# Allegro board minicar-v2_updated.brd
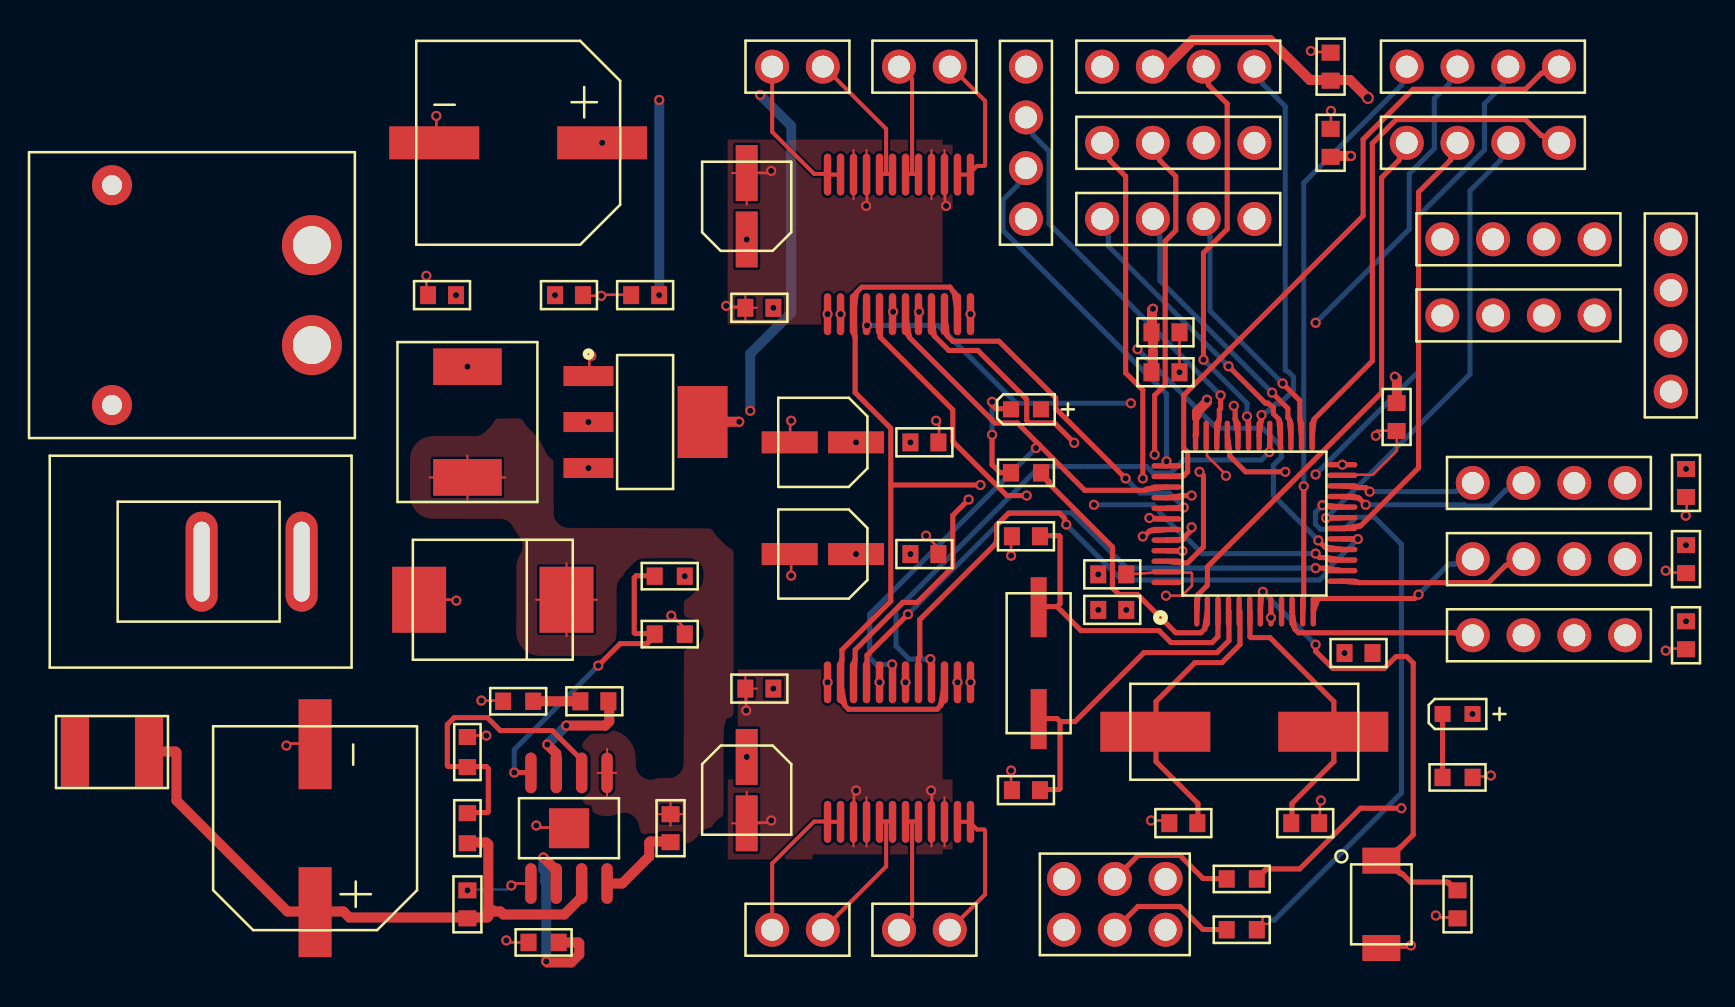
[diagram p0: board, top side]
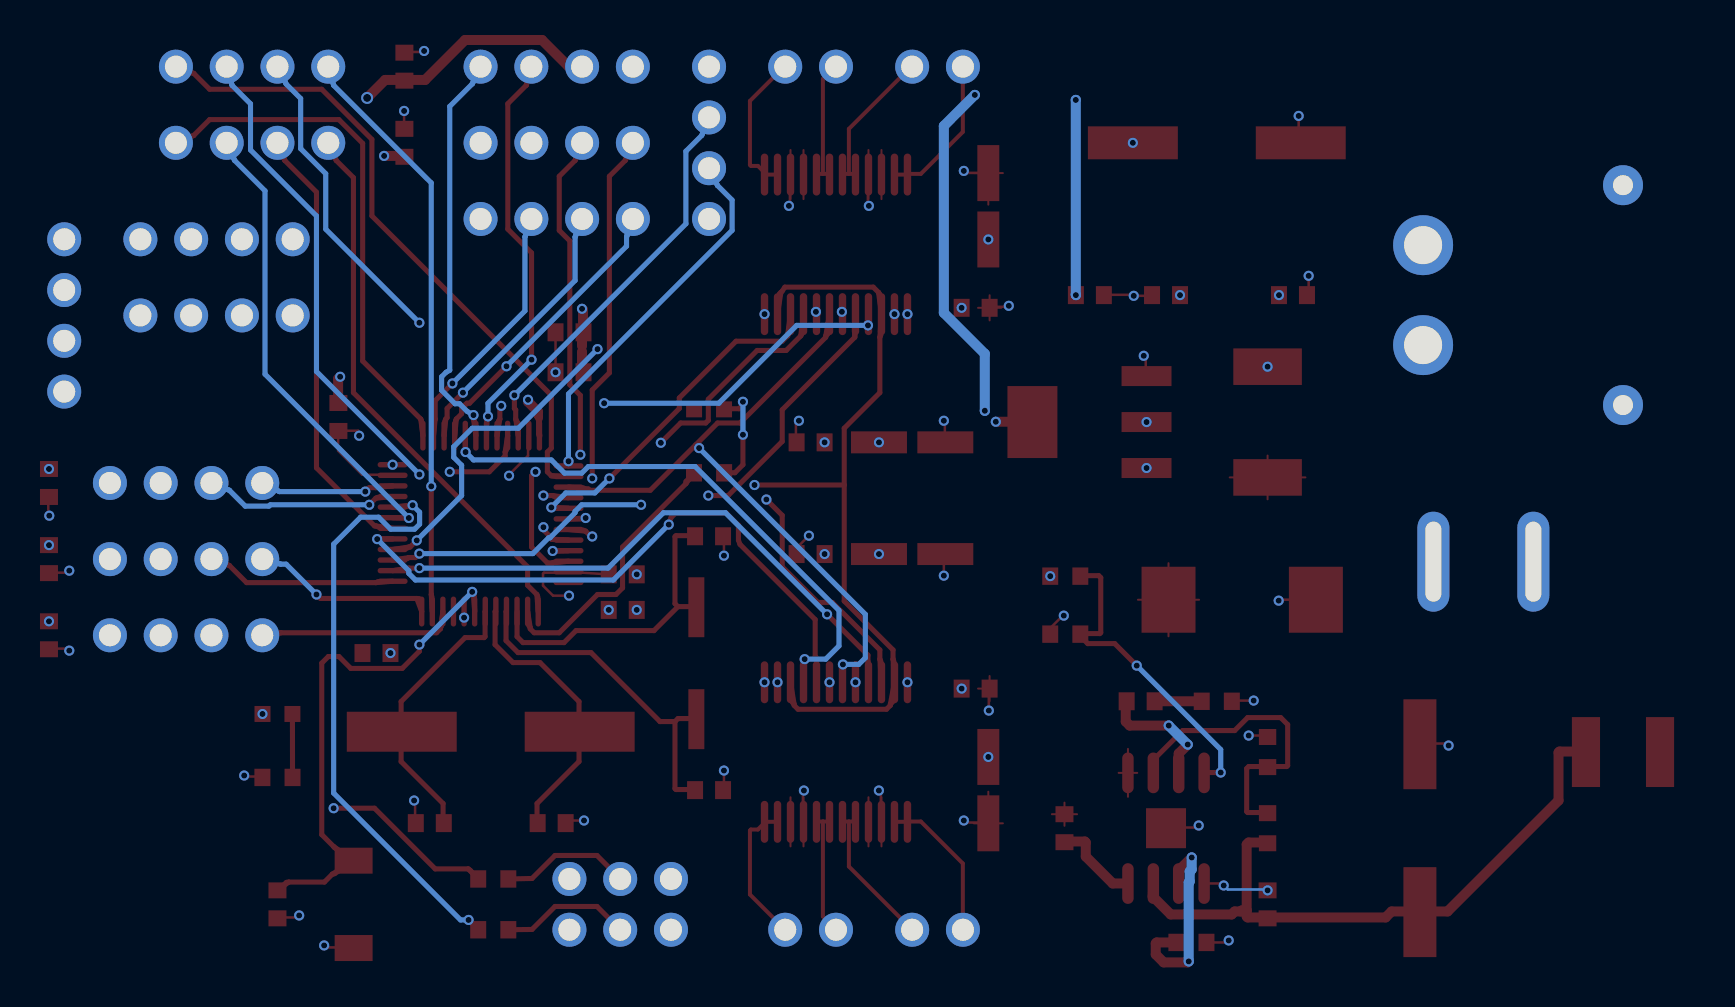
[diagram p1: board, bottom side, seen from below]

No outline. copper layers: TOP, GND, POWER, BOTTOM. Coordinates in mm from the lowest, leftmost part position.

## Design rules (mm)
constraint set DEFAULT: min track width 0.1
net group DP1_8MHZ: nets OSC_IN OSC_OUT
net group DP1_32KHZ: nets PC14 PC15

## Placement (name value [footprint] x y rotation side)
C1  22pF,16V  [C0603]  45.72 20.32 0 top
C2  22pF,16V  [C0603]  45.72 7.62 0 top
C3  22pF,16V  [C0603]  53.59 5.97 0 top
C4  22pF,16V  [C0603]  59.69 5.97 180 top
C5  4.7uF,16V  [C0603]  52.7 30.53 180 top
C6  100nF,16V  [C0603]  50.04 16.64 180 top
C7  100nF,16V  [C0603]  67.31 1.91 90 top
C8  100nF,16V  [C0603]  52.7 28.53 180 top
C9  10nF,16V  [C0603]  50.04 18.42 180 top
C10  1uF,16V  [C0603]  62.36 14.48 0 top
C11  100nF,16V  [C0603]  64.26 26.29 90 top
C12  100uF,50V  [C0603]  27.94 5.71 270 top
C13  220uF, 50V  [CP_D10XL10R2]  10.16 5.71 90 top
C14  10uF,50V  [C0603]  17.78 1.91 270 top
C15  22uF,50V  [C0603]  16.51 32.39 180 top
C16  220uF, 50V  [CP_D10XL10R2]  20.32 40.01 180 top
C17  150pF,50V  [C0603]  24.13 12.07 180 top
C18  4.7uF,50V  [C0603]  26.67 32.39 180 top
C19  1uF,50V  [C0603]  22.86 32.39 180 top
C20  100nF,16V  [C0603]  32.39 31.75 0 top
C21  100nF,16V  [C0603]  40.64 25.02 180 top
C22  10uF, 16V  [CP_D4XL54]  31.75 36.83 90 top
C23  10uF, 16V  [CP_D4XL54]  35.56 25.02 180 top
C24  100nF,16V  [C0603]  32.39 12.7 0 top
C25  100nF,16V  [C0603]  40.64 19.43 180 top
C26  10uF, 16V  [CP_D4XL54]  31.75 7.62 270 top
C27  10uF, 16V  [CP_D4XL54]  35.56 19.43 180 top
C28  100nF,16V  [C0603]  60.96 43.81 270 top
C29  100nF,16V  [C0603]  78.74 15.37 90 top
C30  100nF,16V  [C0603]  78.74 19.18 90 top
C31  100nF,16V  [C0603]  60.96 40.01 270 top
C32  100nF,16V  [C0603]  78.74 22.99 90 top
D1  LED  [LED0603]  67.31 11.43 0 top
D2  LED  [LED0603]  45.72 26.67 0 top
D3  SS34  [DO214AB]  19.05 17.15 180 top
F1  SMD1812-150-33 (3A)  [SMD1812]  0 9.53 0 top
J1  HEADER 4  [HDR4_P254]  45.72 40.01 90 top
J2  HEADER 3X2  [HDR3X2_P254]  50.16 1.91 0 top
J3  HEADER 4  [HDR4_P254]  68.58 43.81 0 top
J4  HEADER 4  [HDR4_P254]  68.58 40.01 0 top
J5  HDR_3V3  [HDR4_P254]  70.36 35.18 0 top
J6  HDR_5V  [HDR4_P254]  70.36 31.37 0 top
J7  HDR_GND  [HDR4_P254]  77.98 31.37 270 top
J8  HEADER 2  [HDR2_P254]  40.64 43.81 180 top
J9  HEADER 2  [HDR2_P254]  34.29 43.81 180 top
J10  HEADER 2  [HDR2_P254]  34.29 0.64 0 top
J11  HEADER 2  [HDR2_P254]  40.64 0.64 0 top
J12  HDR_USART1  [HDR4_P254]  53.34 43.81 180 top
J13  HDR_USART2  [HDR4_P254]  71.88 19.18 0 top
J14  HDR_SERVO  [HDR4_P254]  71.88 15.37 0 top
J15  HDR_I2C1  [HDR4_P254]  53.34 40.01 180 top
J16  HDR_I2C2  [HDR4_P254]  71.88 22.99 180 top
J17  HDR_SPI2  [HDR4_P254]  53.34 36.2 0 top
L1  10uH,3A  [H0630]  17.78 26.04 90 top
R1  10K  [R0603]  56.52 0.64 180 top
R2  10K  [R0603]  56.52 3.18 0 top
R3  510R  [R0603]  67.31 8.26 0 top
R4  510R  [R0603]  45.72 23.5 0 top
R5  100K  [R0603]  17.78 5.71 270 top
R6  100K  [R0603]  17.78 9.53 270 top
R7  100K  [R0603]  21.59 0 0 top
R8  210K 1%  [R0603]  27.9 18.33 180 top
R9  100K  [R0603]  20.32 12.07 0 top
R10  40R2K 1%  [R0603]  27.9 15.43 0 top
SW1  SW_PB_SPST  [SW_PB_4X3]  63.5 1.91 90 top
SW2  -  [KCD11-2P]  6.99 19.05 180 top
U1  STM32F103C8T6  [LQFP_48]  57.15 20.96 0 top
U2  -  [XT30]  0 32.39 90 top
U3  MP1584EN  [SOIC-8-EP]  22.86 5.71 180 top
U4  LDL1117_33R  [SOT223]  26.67 26.04 180 top
U5  TB6612FNG  [SSOP24]  39.37 34.92 180 top
U6  TB6612FNG  [SSOP24]  39.37 9.53 0 top
Y1  32.768kHz  [SMD_32KHZ]  46.36 13.97 90 top
Y2  8MHz  [SMD_8MHZ]  56.64 10.54 180 top

## Library data of the parts
C1-C12 C14 C15 C17-C21 C24 C25 C28-C32 = CAP NP
C13 C16 C22 C23 C26 C27 = CAP POL
D1 D2 = LED
D3 = DIODE
F1 = FUSE
J1 J3-J7 J12-J17 = HEADER 4
J2 = HEADER 3X2
J8-J11 = HEADER 2
L1 = INDUCTOR
R1-R10 = R2
SW1 = SW_PB_SPST
SW2 = SW SPST
U1 = STM32F103C8T6
U2 = XT30
U3 = MP1584EN
U4 = LDL1117_33R
U5 U6 = TB6612FNG
Y1 Y2 = CRYSTAL

## Footprints (pads in the part's own frame, mm; a bottom-side part is the same pattern mirrored in y, then rotated)
C0603
  rect 0.8x0.9 smd: 1(-0.7,0) 2(0.7,0)
CP_D4XL54
  rect 2.8x1.1 smd: 1(-1.66,0) 2(1.66,0)
CP_D10XL10R2
  rect 4.5x1.65 smd: 1(-4.2,0) 2(4.2,0)
DO214AB
  rect 2.7x3.3 smd: 1(-3.686,0) 2(3.686,0)
H0630
  rect 1.83x3.43 smd: 1(-2.77,0) 2(2.77,0)
HDR2_P254
  round 1.7 hole 1.1: 1(-1.27,0) 2(1.27,0)
HDR3X2_P254
  round 1.7 hole 1.1: 1(-2.54,1.27) 2(-2.54,-1.27) 3(0,1.27) 4(0,-1.27) 5(2.54,1.27) 6(2.54,-1.27)
HDR4_P254
  round 1.7 hole 1.1: 1(-3.81,0) 2(-1.27,0) 3(1.27,0) 4(3.81,0)
KCD11-2P
  oval 1.6x5 hole 0.8x4 unplated: (-2.5,0) (2.5,0)
LED0603
  rect 0.8x0.8 smd: 1(-0.749,0) 2(0.749,0)
LQFP_48
  oval 0.27x1.5 smd: 1(-2.885,-4.4) 2(-2.355,-4.4) 3(-1.825,-4.4) 4(-1.295,-4.4) 5(-0.765,-4.4) 6(-0.235,-4.4) 7(0.295,-4.4) 8(0.825,-4.4) 9(1.355,-4.4) 10(1.885,-4.4) 11(2.415,-4.4) 12(2.945,-4.4) 25(2.885,4.4) 26(2.355,4.4) 27(1.825,4.4) 28(1.295,4.4) 29(0.765,4.4) 30(0.235,4.4) 31(-0.295,4.4) 32(-0.825,4.4) 33(-1.355,4.4) 34(-1.885,4.4) 35(-2.415,4.4) 36(-2.945,4.4)
  oval 1.5x0.27 smd: 13(4.4,-2.885) 14(4.4,-2.355) 15(4.4,-1.825) 16(4.4,-1.295) 17(4.4,-0.765) 18(4.4,-0.235) 19(4.4,0.295) 20(4.4,0.825) 21(4.4,1.355) 22(4.4,1.885) 23(4.4,2.415) 24(4.4,2.945) 37(-4.4,2.885) 38(-4.4,2.355) 39(-4.4,1.825) 40(-4.4,1.295) 41(-4.4,0.765) 42(-4.4,0.235) 43(-4.4,-0.295) 44(-4.4,-0.825) 45(-4.4,-1.355) 46(-4.4,-1.885) 47(-4.4,-2.415) 48(-4.4,-2.945)
R0603
  rect 0.8x0.87 smd: 1(-0.753,0) 2(0.753,0)
SMD1812
  rect 1.407x3.499 smd: 1(-1.853,0) 2(1.853,0)
SMD_8MHZ
  rect 5.5x2 smd: 1(-4.45,0) 2(4.45,0)
SMD_32KHZ
  rect 3x0.8 smd: 1(-2.8,0) 2(2.8,0)
SOIC-8-EP
  oval 0.574x2.038 smd: 1(-1.905,-2.769) 2(-0.635,-2.769) 3(0.635,-2.769) 4(1.905,-2.769) 5(1.905,2.769) 6(0.635,2.769) 7(-0.635,2.769) 8(-1.905,2.769)
  rect 2x2 smd: 9(0,0)
SOT223
  rect 2.5x1 smd: 1(2.835,-2.3) 2(2.835,0) 3(2.835,2.3)
  rect 2.5x3.6 smd: 4(-2.873,0)
SSOP24
  oval 0.37x2.1 smd: 1(-3.575,-3.491) 2(-2.925,-3.491) 3(-2.275,-3.491) 4(-1.625,-3.491) 5(-0.975,-3.491) 6(-0.325,-3.491) 7(0.325,-3.491) 8(0.975,-3.491) 9(1.625,-3.491) 10(2.275,-3.491) 11(2.925,-3.491) 12(3.575,-3.491) 13(3.575,3.491) 14(2.925,3.491) 15(2.275,3.491) 16(1.625,3.491) 17(0.975,3.491) 18(0.325,3.491) 19(-0.325,3.491) 20(-0.975,3.491) 21(-1.625,3.491) 22(-2.275,3.491) 23(-2.925,3.491) 24(-3.575,3.491)
SW_PB_4X3
  rect 1.3x1.9 smd: 1(-2.185,0) 2(2.185,0)
XT30
  round 3 hole 1.9: 1(2.5,-10) 2(-2.5,-10)
  round 2 hole 1: 3(5.5,0) 4(-5.5,0)

## Nets
GND: C1.1 C2.1 C3.1 C4.1 C5.1 C6.1 C7.1 C8.1 C9.1 C10.1 C11.1 C13.2 C14.1 C15.2 C16.2 C18.2 C19.1 C20.1 C21.1 C22.2 C23.2 C24.1 C25.1 C26.2 C27.2 C28.1 C29.1 C30.1 C31.1 C32.1 D3.2 J1.1 J2.5 J2.6 J7.1 J7.2 J7.3 J7.4 J12.4 J13.4 J14.3 J14.4 J15.1 J16.1 J17.4 R3.2 R6.1 R7.1 R9.1 R10.2 SW1.1 U1.8 U1.23 U1.35 U1.47(VSS_3) U2.1 U2.3 U2.4 U3.5 U3.9 U4.1 U5.3 U5.4 U5.9 U5.10 U5.18 U6.3 U6.4 U6.9 U6.10 U6.18
VBAT: J4.1 U1.1
VCC3V3: C5.2 C6.2 C8.2 C9.2 C10.2 C11.2 C18.1 C30.2 C31.2 C32.2 D1.2 D2.2 J1.4 J2.1 J2.2 J5.1 J5.2 J5.3 J5.4 J13.3 J15.2 J16.2 U1.9 U1.24 U1.36 U1.48 U4.2 U4.4(VOUT2)
VCC5V: C15.1 C16.1 C19.2 C20.2 C21.2 C22.1 C23.1 C24.2 C25.2 C26.1 C27.1 C28.2 C29.2 J6.1 J6.2 J6.3 J6.4 J12.3 J14.2 L1.2 R8.1 U4.3 U5.13 U5.14(VM3) U5.20 U5.24 U6.13 U6.14(VM3) U6.20 U6.24
VIN_BAT: C13.1 C14.2 F1.2 R5.2 U3.7(VIN)
BOOT0: R2.2 U1.44
BOOT1: R1.1 U1.20
I2C1_SCL: J15.3 U1.42
I2C1_SDA: J15.4 U1.43
I2C2_SCL: J16.3 U1.21
I2C2_SDA: J16.4 U1.22
MOTORIC1_AIN1: U1.40 U5.21
MOTORIC1_AIN2: U1.41 U5.22
MOTORIC1_BIN1: U1.45 U5.17
MOTORIC1_BIN2: U1.46 U5.16
MOTORIC2_AIN1: U1.14 U6.21
MOTORIC2_AIN2: U1.15 U6.22
MOTORIC2_BIN1: U1.17 U6.17
MOTORIC2_BIN2: U1.29 U6.16
MOTORIC_STBY: U1.39 U5.19 U6.19
OSC_IN: C3.2 U1.5 Y2.2
OSC_OUT: C4.2 U1.6 Y2.1
PA1: J3.1 U1.11
PA11: J3.2 U1.32
PA12: J3.3 U1.33
PA15: J3.4 U1.38
PB0: J4.2 U1.18
PB1: J4.3 U1.19
PB12: J4.4 U1.25
PC13: R4.2 U1.2
PC14: C1.2 U1.3 Y1.2
PC15: C2.2 U1.4 Y1.1
RESET: C7.2 SW1.2 U1.7
SPI2_MISO: J17.2 U1.27
SPI2_MOSI: J17.1 U1.28
SPI2_SCK: J17.3 U1.26
SWCLK: J1.2 U1.37
SWDIO: J1.3 U1.34
TIM2_PWM: J14.1 U1.10
TIM3_PWM: U1.16 U5.15 U5.23 U6.15 U6.23
USART1_RX: J12.2 U1.31
USART1_TX: J12.1 U1.30
USART2_RX: J13.2 U1.13
USART2_TX: J13.1 U1.12
N13546: J8.1 U5.1 U5.2
N13563: J8.2 U5.5 U5.6
N13598: J9.1 U5.7 U5.8
N13619: J9.2 U5.11 U5.12
N15223: J10.1 U6.1 U6.2
N15263: J10.2 U6.5 U6.6
N15407: J11.1 U6.7 U6.8
N15519: J11.2 U6.11 U6.12
N31972: C12.2 U3.8
N31979: C12.1 D3.1(K) L1.1 U3.1
N32592: R7.2 U3.6
N32821: R5.1 R6.2 U3.2
N35796: C17.1 U3.3
N36210: C17.2 R9.2
N38494: R8.2 R10.1 U3.4
N053341: J2.4 R1.2
N053344: J2.3 R2.1
N066431: D1.1(CATHODE) R3.1
N066591: D2.1(CATHODE) R4.1
N113201: U2.2
N288331: F1.1

## Via types
v1: diameter 0.508, hole 0.305, TOP to BOTTOM, 143 vias
v2: diameter 0.6, hole 0.4, TOP to BOTTOM, 1 via

## Routing (per net, layer and track width the routed paths; a pad name or vN(x,y) marks a point on that pad's centre or on a via; arc(x,y) is an arc through that point)
GND: length 173
  TOP w0.1: 37.09,37.19 U5.10 37.09,39.64 ; 41,4.81 U6.9 41,7.26 ; 31.02,5.96 C26.2 ; C26.2 32.48,5.96 ; C26.2 31.75,7.54 ; C24.1 32.26,12.7 ; C24.1 31.69,13.33 ; C24.1 31.69,12.07 ; 41.65,37.19 41.65,39.64 ; 31.11,31.75 C20.1 ; C20.1 31.69,32.38 ; C20.1 32.26,31.75 ; C20.1 31.69,31.12 ; 37.75,39.64 37.75,37.19 ; 41,39.64 U5.4 41,37.19 ; C22.2 32.48,38.49 ; C22.2 31.75,36.91 ; C22.2 31.02,38.49 ; 41.65,4.81 U6.10 41.65,7.26 ; 37.75,7.26 U6.4 37.75,4.81 ; 37.09,4.81 U6.3 37.09,7.26
  TOP w0.127: v1(31.73,11.6) 31.73,12.65 31.69,12.7 C24.1 ; v1(37.23,7.6) 37.12,7.5 37.12,6.1 U6.3 ; C3.1 52.89,5.96 52.83,6.1 v1(51.98,6.1) ; v1(44.98,8.6) 44.98,7.7 45.02,7.62 C2.1 ; v1(19.73,0.1) 19.83,0 20.83,0 20.84,0 R7.1 ; v1(40.98,7.6) 41.02,7.55 41.02,6.1 U6.9 ; v1(55.73,23.35) 55.73,23.4 54.78,24.35 54.78,25.35 U1.35 ; C7.1 67.28,1.25 66.33,1.25 v1(66.22,1.35) ; C4.1 60.39,5.96 60.42,6.05 60.42,7.05 v1(60.48,7.1) ; C21.1 41.34,25.02 41.38,25.1 41.38,25.95 v1(41.23,26.1) ; C26.2 31.75,5.96 31.83,6 32.88,6 v1(32.98,6.1) ; R6.1 17.88,10.35 v1(18.73,10.35) ; C16.2 16.23,40.15 v1(16.23,41.35) ; C5.1 v1(53.4,28.53) ; C1.1 45.02,20.32 44.98,20.3 v1(44.98,19.35) ; v1(19.98,2.85) 20.08,2.95 20.93,2.95 U3.5 ; v1(27.98,16.35) 28.03,16.3 28.08,16.3 28.68,15.7 R10.2 ; v1(33.98,26.1) 33.93,26.05 33.93,25.1 33.9,25.02 C23.2 ; v1(60.98,41.6) 60.98,40.8 C31.1 ; C22.2 31.75,38.5 31.83,38.5 32.88,38.5 v1(32.98,38.6) ; C30.1 78.74,18.48 78.72,18.5 77.78,18.5 77.72,18.55 v1(77.72,18.6) ; U1.8 v1(57.98,16.25) ; D3.2 15.43,17.15 17.18,17.15 v1(17.23,17.1) ; v1(30.73,31.85) 30.78,31.8 31.68,31.8 31.69,31.76 C20.1 ; v1(37.73,36.85) 37.77,36.9 37.77,38.4 37.75,38.42 ; v1(68.97,8.35) 68.92,8.3 68.12,8.3 R3.2 ; v1(41.73,36.85) 41.68,36.9 41.68,38.4 41.65,38.42 ; C13.2 10.12,9.95 8.78,9.95 8.73,9.9 v1(8.73,9.85) ; v1(78.72,21.35) 78.78,21.4 78.78,22.25 78.74,22.29 C32.1 ; v1(63.23,25.35) 63.23,25.55 63.28,25.6 64.22,25.6 64.26,25.59 ; v1(18.48,12.1) 19.53,12.1 R9.1 ; C25.1 41.34,19.44 41.38,19.7 v1(40.73,20.35) ; SW1.1 63.58,-0.25 64.88,-0.25 v1(64.97,-0.15) ; C15.2 15.73,32.5 v1(15.73,33.35) ; C28.1 60.92,44.55 60.03,44.55 v1(59.98,44.6) ; v1(52.73,17.35) 53.53,17.35 54.03,17.85 54.03,18.45 53.98,18.5 52.83,18.5 U1.47 50.74,18.42 C9.1 ; v1(33.98,18.35) 33.98,19.4 33.9,19.44 C27.2 ; C18.2 25.93,32.4 24.58,32.4 24.53,32.35 v1(24.48,32.35) 23.62,32.35 C19.1 ; C11.1 64.26,25.59 ; 64.26,25.59 64.28,25.6 64.28,24.6 63.08,23.4 61.62,23.4 U1.23 ; C29.1 78.74,14.67 78.72,14.7 77.78,14.7 77.72,14.65 v1(77.72,14.6) ; U3.9 22.83,5.75 21.33,5.75 v1(21.23,5.85) ; U4.1 23.84,28.33 23.88,28.4 23.88,29.25 v1(23.98,29.35) ; U5.18 v1(39.08,31.55)
  GND w0.1: 77.98,29.07 J7.3 ; J7.3 79.01,30.1 ; J7.3 77.98,31.13 ; J7.3 76.95,30.1 ; U2.4 0,28.06 ; U2.4 0,25.71 ; U2.4 1.18,26.89 ; U2.4 -1.18,26.89 ; U2.1 11.68,34.89 ; U2.1 10,33.21 ; U2.1 8.32,34.89 ; U2.1 10,36.56 ; J15.1 58.18,40.01 ; J15.1 57.15,38.98 ; J15.1 57.15,41.03 ; J15.1 56.12,40.01 ; J7.1 79.01,35.18 ; J7.1 76.95,35.18 ; J7.1 77.98,36.21 ; J7.1 77.98,34.15 ; J2.6 52.7,1.66 ; J2.6 52.7,-0.39 ; J2.6 53.73,0.64 ; J2.6 51.68,0.64 ; 51.68,3.18 J2.5 ; J2.5 52.7,4.2 ; J2.5 53.73,3.18 ; J2.5 52.7,2.15 ; 44.69,36.2 J1.1 ; J1.1 45.72,35.17 ; J1.1 46.75,36.2 ; J1.1 45.72,37.22 ; 74.66,15.37 J14.4 ; J14.4 75.69,14.34 ; J14.4 75.69,16.4 ; J14.4 76.72,15.37 ; J7.4 77.98,28.59 ; J7.4 77.98,26.53 ; J7.4 79.01,27.56 ; J7.4 76.95,27.56 ; -1.18,37.89 U2.3 ; U2.3 0,39.06 ; U2.3 1.18,37.89 ; U2.3 0,36.71 ; 73.15,14.34 J14.3 ; J14.3 73.15,16.4 ; J14.3 74.18,15.37 ; J14.3 72.12,15.37 ; 74.66,19.18 J13.4 ; J13.4 75.69,20.21 ; J13.4 76.72,19.18 ; J13.4 75.69,18.15 ; J7.2 79.01,32.64 ; J7.2 76.95,32.64 ; J7.2 77.98,31.61 ; J7.2 77.98,33.67 ; J17.4 57.15,37.22 ; J17.4 56.12,36.2 ; J17.4 57.15,35.17 ; J17.4 58.18,36.2 ; J12.4 50.56,43.81 ; J12.4 49.53,44.84 ; J12.4 49.53,42.79 ; J12.4 48.5,43.81 ; 74.66,22.99 J16.1 ; J16.1 75.69,24.02 ; J16.1 75.69,21.96 ; J16.1 76.72,22.99
  GND w0.127: 57.48,14.6 57.98,15.1 v1(57.98,16.25) ; v1(39.7,13.02) 39.73,13 39.73,10.85 ; v1(39.08,31.55) 39.08,33.5 38.98,33.6
  BOTTOM w0.127: v1(17.78,2.61) 17.88,2.65 19.78,2.65 v1(19.98,2.85)
  vias: v1(50.74,16.64) v1(61.66,14.48)
VBAT: length 29.5
  TOP w0.254: 54.34,17.41 54.29,17.3 U1.1 54.34,17.41 ; 54.34,17.41 54.8,17.87 54.8,18.79 63.51,27.51 63.51,38.26 64.37,39.12 ; 64.37,39.12 64.42,39.23 J4.1 64.37,39.12
VCC3V3: length 82.8
  TOP w0.3: 54.23,26.15 54.23,25.45 U1.36
  TOP w0.325: 54.23,26.2 54.23,26.15
  TOP w0.349: 54.23,26.25 54.23,26.2
  TOP w0.374: 54.23,26.3 54.23,26.25
  TOP w0.4: 52.08,29.75 52.08,29.65 ; 54.28,26.35 54.23,26.3
  TOP w0.425: 52.08,29.65 52.08,29.6 ; 52.08,29.8 52.08,29.75
  TOP w0.43: 54.28,26.4 54.28,26.35
  TOP w0.449: 52.08,29.85 52.08,29.8 ; 52.08,29.6 52.08,29.55
  TOP w0.454: 54.28,26.45 54.28,26.4
  TOP w0.474: 52.08,29.9 52.08,29.85 ; 52.08,29.55 52.08,29.5
  TOP w0.479: 54.28,26.5 54.28,26.45
  TOP w0.498: 52.08,29.5 52.08,29.45 ; 52.08,29.95 52.08,29.9
  TOP w0.5: v1(61.98,39.35) 61.03,39.35 C31.2 ; U4.4 29.54,26.03 29.62,26.05 v1(31.38,26.05) ; C11.2 64.26,26.98 64.28,27.05 64.28,28.2 v1(64.17,28.3) ; 52.08,29.95 52.08,30.5 C5.2 52.03,30.6 52.03,31.65 v1(52.08,31.7) ; 52.08,29.45 52.08,28.6 C8.2 ; v1(54.78,27.15) 54.78,27.05 54.28,26.55 54.28,26.5
  POWER w0.1: J5.2 70.12,35.18 ; J5.2 68.06,35.18 ; J5.2 69.09,36.21 ; 47.62,-0.39 J2.2 ; J2.2 46.6,0.64 ; J2.2 47.62,1.66 ; J2.2 48.65,0.64 ; J15.2 55.64,40.01 ; J15.2 54.61,41.03 ; J15.2 53.58,40.01 ; J15.2 54.61,38.98 ; J5.4 75.2,35.18 ; J5.4 74.17,36.21 ; J5.4 73.14,35.18 ; 72.12,22.99 J16.2 ; J16.2 73.15,24.02 ; J16.2 73.15,21.96 ; J16.2 74.18,22.99 ; 45.72,42.79 J1.4 ; J1.4 44.69,43.81 ; J1.4 45.72,44.84 ; J1.4 46.75,43.81 ; J5.1 66.55,36.21 ; J5.1 67.58,35.18 ; J5.1 65.52,35.18 ; J2.1 48.65,3.18 ; J2.1 47.62,2.15 ; J2.1 46.6,3.18 ; J2.1 47.62,4.2 ; J5.3 72.66,35.18 ; J5.3 71.63,36.21 ; J5.3 70.6,35.18
  POWER w0.5: 27.68,42.95 27.68,42.35 27.48,42.15 v1(27.38,42.15) ; 64.08,27.55 64.08,28.2 v1(64.17,28.3) ; 14.03,26.15 23.78,26.15 23.88,26.05 v1(23.84,26.04) ; v1(31.38,26.05) v1(31.93,26.6) ; v1(32.43,42.4) 31.88,42.95
  BOTTOM w0.5: v1(27.38,42.15) 27.38,32.4 v1(27.37,32.39) ; v1(31.93,26.6) 31.93,29.45 33.98,31.5 33.98,40.85 v1(32.43,42.4)
  vias: v1(49.34,18.42) v1(49.34,16.64) v1(61.55,23.9) v1(68.06,11.43) v1(78.74,23.69) v1(78.74,19.88)
VCC5V: length 70.1
  TOP w0.4: U5.20 v1(40.38,31.55)
  TOP w0.5: v2(62.83,42.25) 61.92,43.15 61.03,43.15 C28.2 60.98,43.15 59.92,43.15 57.92,45.15 54.08,45.15 52.78,43.85 J12.3
  POWER w0.1: J6.2 69.09,32.4 ; J6.2 68.06,31.37 ; J6.2 69.09,30.34 ; J6.2 70.12,31.37 ; 71.63,30.34 J6.3 ; J6.3 71.63,32.4 ; J6.3 72.66,31.37 ; J6.3 70.6,31.37 ; 69.58,15.37 J14.2 ; J14.2 70.61,14.34 ; J14.2 70.61,16.4 ; J14.2 71.64,15.37 ; 66.55,30.34 J6.1 ; J6.1 65.52,31.37 ; J6.1 67.58,31.37 ; J6.1 66.55,32.4 ; J6.4 74.17,32.4 ; J6.4 74.17,30.34 ; J6.4 75.2,31.37 ; J6.4 73.14,31.37
  POWER w0.254: 70.08,18.2 70.03,18.2
  POWER w0.274: 70.03,18.2 69.97,18.2
  POWER w0.327: 69.97,18.2 69.92,18.2
  POWER w0.369: 69.42,19.15 69.42,19.2 ; 69.42,23 69.42,22.95
  POWER w0.37: 69.42,23.05 69.42,23
  POWER w0.371: 69.42,22.95 69.42,22.9 ; 69.42,19.1 69.42,19.15 ; 69.42,19.25 69.42,19.2
  POWER w0.373: 69.42,23.1 69.42,23.05
  POWER w0.375: 69.42,19.3 69.42,19.25 ; 69.42,19.05 69.42,19.1
  POWER w0.376: 69.42,22.9 69.42,22.85
  POWER w0.381: 69.42,23.15 69.42,23.1
  POWER w0.383: 69.92,18.2 69.88,18.2 ; 69.42,19 69.42,19.05 ; 69.42,19.35 69.42,19.3
  POWER w0.385: 69.42,22.85 69.42,22.8
  POWER w0.393: 69.42,23.2 69.42,23.15
  POWER w0.395: 69.42,19.4 69.42,19.35 ; 69.42,18.95 69.42,19
  POWER w0.398: 69.42,22.8 69.42,22.75
  POWER w0.409: 69.42,23.25 69.42,23.2
  POWER w0.412: 69.42,19.45 69.42,19.4 ; 69.42,18.9 69.42,18.95
  POWER w0.416: 69.42,22.75 69.42,22.7
  POWER w0.418: 69.78,18.3 69.72,18.35
  POWER w0.419: 69.83,18.25 69.78,18.3
  POWER w0.42: 69.72,18.35 69.67,18.4
  POWER w0.426: 69.88,18.2 69.83,18.25
  POWER w0.428: 69.67,18.4 69.62,18.45
  POWER w0.429: 69.42,23.3 69.42,23.25
  POWER w0.433: 69.42,19.5 69.42,19.45 ; 69.42,18.85 69.42,18.9
  POWER w0.437: 69.42,22.7 69.42,22.65
  POWER w0.446: 69.62,18.45 69.58,18.5
  POWER w0.452: 69.42,23.35 69.42,23.3
  POWER w0.458: 69.42,18.8 69.42,18.85 ; 69.42,19.55 69.42,19.5
  POWER w0.463: 69.42,22.65 69.42,22.6
  POWER w0.471: 69.58,18.5 69.53,18.55
  POWER w0.479: 69.42,23.4 69.42,23.35
  POWER w0.486: 69.42,18.75 69.42,18.8 ; 69.42,19.6 69.42,19.55
  POWER w0.492: 69.42,22.6 69.42,22.55 ; 52.03,32.35 52.12,32.35
  POWER w0.496: 51.98,32.35 52.03,32.35 ; 52.12,32.35 52.17,32.35
  POWER w0.5: 69.42,18.75 69.42,18.65 69.53,18.55 ; 73.53,28.35 69.42,24.25 69.42,23.4 ; 52.17,32.35 61.88,32.35 62.73,31.5 ; 69.42,22.55 69.42,19.6 ; 46.48,32.35 51.98,32.35 ; v2(62.83,42.25) 62.83,34.2
  vias: v1(17.21,32.39) v1(17.78,28.8) v1(22.16,32.39) v1(23.84,23.74) v1(24.52,40.01) v1(28.65,18.33) v1(31.75,35.17) v1(31.75,9.28) v1(33.09,31.75) v1(33.09,12.7) v1(35.8,31.43) v1(35.8,13.02) v1(36.45,31.43) v1(37.22,25.02) v1(37.22,19.43) v1(38.4,13.02) v1(39.94,25.02) v1(39.94,19.43) v1(42.3,13.02) v1(42.95,31.43) v1(42.95,13.02) v1(78.74,16.07)
VIN_BAT: length 32.5
  TOP w0.5: 18.83,1.6 18.83,1.3 18.78,1.25 17.88,1.25 C14.2 17.83,1.25 11.88,1.25 11.58,1.55 10.23,1.55 C13.1 10.18,1.55 8.78,1.55 3.23,7.1 3.23,9.5 3.18,9.55 1.93,9.55 F1.2 ; 18.83,1.6 18.83,4.9 18.73,5 17.88,5 R5.2 ; 18.83,1.6 19.08,1.6 19.12,1.55 19.43,1.55 19.58,1.4 22.62,1.4 23.53,2.3 U3.7
BOOT0: length 32.2
  TOP w0.254: 57.77,3.68 R2.2 57.67,3.61 57.77,3.68 ; 57.77,3.68 59.42,3.68 62.45,6.72 v1(64.5,6.72) ; 53.61,20.18 53.5,20.16 52.75,20.13 53.61,20.18 ; 53.61,20.18 53.61,20.25 54.01,20.64 v1(54.01,20.77)
  POWER w0.254: v1(54.01,20.77) 54.2,20.58 57.5,20.58 64.5,13.58 v1(64.5,6.72)
BOOT1: length 31.4
  TOP w0.254: v1(60.55,21.88) 60.7,21.88 ; 60.7,21.88 61.55,21.78 60.81,21.83 60.7,21.88 ; 57.67,1.07 R1.1 v1(57.75,1.12) 57.67,1.07
  BOTTOM w0.254: v1(57.75,1.12) 58.15,1.12 64.5,7.48 64.5,19.93 63.15,21.28 62.25,21.28 61.65,20.68 60.45,20.68 60.2,20.93 60.2,21.53 v1(60.55,21.88)
I2C1_SCL: length 22.4
  TOP w0.254: 52.42,39.12 53.21,38.33 53.21,35.62 52.69,35.09 52.69,27.9 52.16,27.37 v1(52.16,24.4) ; 52.42,39.12 52.38,39.22 J15.3 52.42,39.12 ; 52,21.22 U1.42 v1(51.89,21.24) 52,21.22
  POWER w0.254: v1(52.16,24.4) 52.16,23.02 51.89,22.75 v1(51.89,21.24)
I2C1_SDA: length 24.1
  TOP w0.254: v1(51.56,20.31) 51.63,20.31 51.89,20.58 ; 49.91,39.12 J15.4 49.87,39.23 49.91,39.12 ; 49.91,39.12 50.71,38.33 50.71,28.5 51.56,27.64 v1(51.56,23.21) ; 51.89,20.58 U1.43 52.01,20.62 51.89,20.58
  POWER w0.254: v1(51.56,23.21) 51.04,22.69 51.04,20.71 51.37,20.38 v1(51.56,20.31)
I2C2_SCL: length 11.4
  TOP w0.254: 62.39,22.23 U1.21 62.29,22.27 62.39,22.23 ; 62.39,22.23 v1(62.72,21.9)
  BOTTOM w0.254: 69.71,22.62 J16.3 69.83,22.67 69.71,22.62 ; 69.71,22.62 68.92,21.83 67.73,21.83 67.67,21.9 v1(62.72,21.9)
I2C2_SDA: length 8.5
  TOP w0.254: 62.39,22.75 62.72,22.75 v1(62.92,22.55) ; 62.39,22.75 U1.22 62.29,22.79 62.39,22.75
  BOTTOM w0.254: 67.21,22.55 J16.4 67.31,22.61 67.21,22.55 ; 67.21,22.55 v1(62.92,22.55)
MOTORIC1_AIN1: length 25.5
  TOP w0.254: v1(48.13,25) 47.14,25.99 45.89,25.99 45.76,26.12 45.76,27.18 43.31,29.62 41.86,29.62 41.14,30.34 ; 41.14,30.34 41,31.43 41.1,30.42 41.14,30.34 ; 53.54,22.36 53.48,22.33 U1.40 53.54,22.36 ; 53.54,22.36 v1(54.01,22.36)
  POWER w0.254: v1(48.13,25) 50.71,27.57 51.23,27.57 55,23.81 55,23.28 54.73,23.02 54.67,23.02 v1(54.01,22.36)
MOTORIC1_AIN2: length 19.6
  TOP w0.254: 41.8,30.34 41.75,30.42 U5.22 41.8,30.34 ; 41.8,30.34 42.06,30.08 44.37,30.08 47.21,27.24 47.21,26.71 v1(50.71,23.21) ; v1(53.61,21.76) U1.41 53.5,21.75 v1(53.61,21.76)
  BOTTOM w0.254: v1(50.71,23.21) 51.43,22.49 52.88,22.49 v1(53.61,21.76)
MOTORIC1_BIN1: length 25.2
  TOP w0.254: 38.43,30.28 38.43,30.39 38.4,31.43 38.43,30.28 ; 38.43,30.28 42.06,26.65 42.06,25.06 44.77,22.36 v1(45.76,22.36) ; v1(53.54,19.59) 53.5,19.59 U1.45 v1(53.54,19.59)
  POWER w0.254: v1(45.76,22.36) 48.13,22.36 48.53,21.96 48.53,21.7 51.43,18.79 51.83,18.79 52.62,19.59 v1(53.54,19.59)
MOTORIC1_BIN2: length 26.5
  TOP w0.254: 53.54,18.99 53.49,19.02 U1.46 53.54,18.99 ; 53.54,18.99 53.81,18.99 54.6,19.78 54.6,23.35 v1(54.4,23.55)
  POWER w0.254: v1(54.4,23.55) v1(50.97,26.98)
  BOTTOM w0.254: v1(37.77,30.87) 41.33,30.87 45.23,26.98 v1(50.97,26.98)
MOTORIC2_AIN1: length 30.1
  TOP w0.254: 60.74,18.73 v1(60.21,18.73) ; 60.74,18.73 60.82,18.68 U1.14 60.74,18.73 ; U6.21 37.77,14.06 37.77,14.37 v1(39.82,16.42)
  BOTTOM w0.254: v1(60.21,18.73) 50.77,18.73 48,21.5 44.9,21.5 v1(39.82,16.42)
MOTORIC2_AIN2: length 34
  TOP w0.254: 37.18,14.17 U6.22 37.13,14.06 37.18,14.17 ; 37.18,14.17 37.18,14.64 39.55,17.01 40.28,17.01 42.06,18.79 42.06,21.37 v1(42.85,22.16) ; 60.74,19.26 61.55,19.13 60.82,19.21 60.74,19.26 ; 60.74,19.26 60.41,19.26 v1(60.21,19.45)
  GND w0.254: v1(49.12,21.9) 48.99,21.76 43.25,21.76 v1(42.85,22.16)
  BOTTOM w0.254: v1(49.12,21.9) 52.09,21.9 52.42,21.57 52.42,21.5 53.68,20.25 53.74,20.25 54.53,19.45 v1(60.21,19.45)
MOTORIC2_BIN1: length 31.7
  TOP w0.254: U6.17 40.34,14.06 40.34,14.24 40.41,14.31 40.41,16.15 44.17,19.92 44.25,20.12 44.25,20.88 44.85,21.48 47.4,21.48 47.62,21.25 v1(47.74,20.91) ; 62.3,20.18 U1.17 v1(62.32,20.18) 62.3,20.18
  BOTTOM w0.254: v1(47.74,20.91) 50.51,18.13 60.41,18.13 60.74,18.46 60.74,18.6 v1(62.32,20.18)
MOTORIC2_BIN2: length 30
  TOP w0.254: v1(40.94,14.17) 40.96,14.06 U6.16 v1(40.94,14.17) ; 57.9,24.61 U1.29 v1(57.9,24.54) 57.9,24.61
  BOTTOM w0.254: v1(57.9,24.54) 57.5,24.14 53.61,24.14 52.95,23.48 52.09,23.48 51.76,23.81 46.42,23.81 39.22,16.62 39.22,14.83 39.88,14.17 v1(40.94,14.17)
MOTORIC_STBY: length 34.7
  TOP w0.254: 39.88,30.34 39.8,30.42 39.7,31.43 39.88,30.34 ; 39.88,30.34 39.88,30.28 44.17,25.99 45.29,25.99 46.38,24.9 ; 46.38,24.9 48.66,22.62 51.7,22.62 51.76,22.69 51.89,22.69 ; 46.38,24.9 v1(46.22,24.73) ; 51.89,22.69 52.01,22.74 52.75,22.78 51.89,22.69
  BOTTOM w0.254: v1(46.22,24.73) 37.9,16.42 37.9,14.24 38.23,13.91 v1(39.02,13.91)
OSC_IN: length 14.1
  TOP w0.254: U1.5 56.42,16.55 56.42,14.9 55.53,14 54.17,14 52.23,12.05 52.23,10.6 52.19,10.55 ; 52.19,10.55 52.23,10.5 52.23,9.05 54.33,6.95 54.33,6.05 54.29,5.96 C3.2 ; 52.19,10.55 Y2.2
OSC_OUT: length 13.8
  TOP w0.254: Y2.1 61.09,10.55 ; 61.09,10.55 61.12,10.6 61.12,12.05 57.92,15.25 56.98,15.25 56.92,15.3 56.92,16.55 U1.6 ; 61.09,10.55 61.12,10.5 61.12,9.05 59.03,6.95 59.03,6.05 58.99,5.96 C4.2
PA1: length 31.1
  TOP w0.254: 59.62,17.41 59.59,17.3 U1.11 59.62,17.41 ; 59.62,17.41 v1(59.62,22.82)
  BOTTOM w0.254: 64.5,42.88 J3.1 64.5,42.88 ; 64.5,42.88 59.62,38 v1(59.62,22.82)
PA11: length 24.9
  TOP w0.254: 56.18,26.19 56.25,26.08 U1.32 56.18,26.19 ; 56.18,26.19 56.18,26.78 v1(56.12,26.85)
  POWER w0.254: v1(60.21,31) 58.16,28.96 58.16,28.89 v1(56.12,26.85)
  BOTTOM w0.254: v1(60.21,31) 64.9,35.69 64.9,38.46 66.15,39.72 66.15,42.22 66.88,42.95 ; 66.88,42.95 66.93,43.06 J3.2 66.88,42.95
PA12: length 31.8
  TOP w0.254: v1(58.69,23.55) 56.71,23.55 55.92,24.34 55.92,24.54 ; 55.92,24.54 U1.33 55.87,24.63 55.92,24.54
  POWER w0.254: v1(60.21,23.41) 60.08,23.55 v1(58.69,23.55)
  BOTTOM w0.254: v1(60.21,23.41) 65.36,28.56 65.36,36.35 68.66,39.65 68.66,41.96 69.58,42.88 ; 69.58,42.88 J3.3 69.62,43 69.58,42.88
PA15: length 34.6
  TOP w0.254: 53.61,23.35 U1.38 53.5,23.34 53.61,23.35 ; 53.61,23.35 53.81,23.55 53.81,24.54 53.61,24.73 53.61,27.37 62.59,36.35 62.59,40.18 65.09,42.69 70.7,42.69 71.5,43.48 ; 71.5,43.48 71.6,43.51 J3.4 71.5,43.48
PB0: length 23.8
  TOP w0.254: 62.39,20.84 62.45,20.84 65.36,23.74 65.36,37.54 66.94,39.12 ; 62.39,20.84 62.28,20.79 U1.18 62.39,20.84 ; 66.94,39.12 66.98,39.22 J4.2 66.94,39.12
PB1: length 25.1
  TOP w0.254: 60.8,21.24 U1.19 v1(60.74,21.24) 60.8,21.24
  BOTTOM w0.254: 69.45,39.12 69.5,39.23 J4.3 69.45,39.12 ; 69.45,39.12 67.93,37.6 67.93,28.43 v1(60.74,21.24)
PB12: length 27.9
  TOP w0.254: 71.5,40.38 70.7,41.17 64.24,41.17 63.05,39.98 63.05,29.09 60.14,26.19 ; 71.5,40.38 71.6,40.33 J4.4 71.5,40.38 ; 60.14,26.19 60.1,26.09 U1.25 60.14,26.19
PC13: length 15.2
  TOP w0.254: 46.88,22.95 R4.2 46.87,23.06 46.88,22.95 ; 46.88,22.95 50.05,19.78 50.05,17.74 50.38,17.41 51.3,17.41 53.21,15.49 54.47,15.49 54.67,15.69 54.67,15.76 ; 54.67,15.76 U1.2 54.72,15.83 54.67,15.76
PC14: length 15.7
  TOP w0.254: 47.28,16.8 48.48,15.6 52.38,15.6 52.98,15 55.03,15 55.33,15.3 U1.3 ; 47.28,16.8 46.42,16.8 46.36,16.77 Y1.2 ; 47.28,16.8 47.42,16.95 47.42,20.3 47.38,20.35 46.48,20.35 46.42,20.32 C1.2
PC15: length 17.1
  TOP w0.254: C2.2 46.42,7.62 46.48,7.65 47.38,7.65 47.42,7.7 47.42,11.05 ; 47.42,11.05 48.17,11.05 51.62,14.5 55.28,14.5 55.88,15.1 55.88,16.55 U1.4 ; 47.42,11.05 47.28,11.2 46.42,11.2 46.36,11.17 Y1.1
RESET: length 29.7
  TOP w0.254: 66.74,3.02 64.96,3.02 64.57,3.42 ; 66.74,3.02 C7.2 66.86,3.01 66.74,3.02 ; 64.5,4.8 65.09,5.4 65.09,13.98 64.76,14.31 64.24,14.31 63.64,13.71 61.07,13.71 60.21,14.57 v1(60.21,14.9) ; 64.5,4.8 SW1.2 ; 64.5,4.8 64.45,4.74 SW1.2 ; 64.57,3.42 SW1.2 ; 64.57,3.42 64.45,3.44 SW1.2 ; v1(57.57,17.54) 57.5,17.47 57.5,17.41 ; 57.5,17.41 57.45,16.55 57.47,17.3 57.5,17.41
  BOTTOM w0.254: v1(57.57,17.54) v1(60.21,14.9)
SPI2_MISO: length 15.4
  TOP w0.254: v1(58.03,27.51) 58.82,26.71 58.82,26.25 58.89,26.19 ; 58.89,26.19 U1.27 58.93,26.09 58.89,26.19
  BOTTOM w0.254: v1(58.03,27.51) 52.42,33.12 52.42,35.29 ; 52.42,35.29 52.38,35.4 J17.2 52.42,35.29
SPI2_MOSI: length 16.3
  TOP w0.254: v1(55.85,28.83) 57.7,26.98 57.83,26.98 57.9,26.91 58.1,26.78 58.1,26.45 58.36,26.19 ; 58.36,26.19 58.4,26.09 U1.28 58.36,26.19
  BOTTOM w0.254: 49.85,35.29 J17.1 49.81,35.39 49.85,35.29 ; 49.85,35.29 49.85,34.83 v1(55.85,28.83)
SPI2_SCK: length 14.6
  TOP w0.254: 59.42,26.19 U1.26 59.46,26.09 59.42,26.19 ; 59.42,26.19 59.42,27.11 v1(58.56,27.97)
  BOTTOM w0.254: 54.93,35.29 54.93,31.6 v1(58.56,27.97) ; 54.93,35.29 54.9,35.39 J17.3 54.93,35.29
SWCLK: length 19.9
  TOP w0.254: 52.75,23.84 v1(52.75,24.07) 52.75,23.98 52.75,23.84
  BOTTOM w0.254: v1(52.75,24.07) 52.75,27.44 44.57,35.62 44.57,37.14 45.29,37.87 ; 45.29,37.87 J1.2 45.35,37.97 45.29,37.87
SWDIO: length 21.7
  TOP w0.254: 55.39,26.19 55.39,26.65 55.46,26.71 v1(55.46,27.37) ; 55.39,26.19 55.34,26.08 U1.34 55.39,26.19
  BOTTOM w0.254: 46.09,40.38 46.88,39.58 46.88,35.95 v1(55.46,27.37) ; 46.09,40.38 J1.3 46.04,40.49 46.09,40.38
TIM2_PWM: length 11.6
  TOP w0.254: 59.15,15.76 U1.10 59.11,15.83 59.15,15.76 ; 59.15,15.76 59.15,15.69 59.35,15.49 67.14,15.49 ; 67.14,15.49 67.23,15.48 J14.1 67.14,15.49
TIM3_PWM: length 74
  TOP w0.254: 36.65,11.93 36.65,11.86 36.85,11.67 41.27,11.67 41.47,11.86 41.47,11.93 ; 36.65,11.93 36.45,13.02 ; 36.65,11.93 36.56,12.01 36.45,13.02 ; 37.18,30.28 37.13,30.39 37.09,31.43 ; 37.18,30.28 37.18,27.51 38.96,25.72 38.96,22.89 ; 37.18,30.28 37.09,31.43 ; v1(60.34,20.11) 60.67,19.78 60.74,19.78 ; 37.24,32.52 37.09,31.43 ; 37.24,32.52 37.2,32.45 37.09,31.43 ; 37.24,32.52 37.51,32.79 41.93,32.79 42.06,32.59 42.13,32.52 ; 36.45,13.02 36.48,14.06 36.52,14.17 ; 36.45,13.02 36.52,14.17 ; 38.96,22.89 v1(43.45,22.89) ; 38.96,22.89 38.96,17.08 36.52,14.64 36.52,14.17 ; 60.74,19.78 60.82,19.73 U1.16 60.74,19.78 ; 41.47,11.93 U6.15 41.54,12 41.47,11.93 ; 42.13,32.52 U5.23 42.19,32.45 42.13,32.52
  POWER w0.254: v1(51.3,29.68) 50.24,29.68 v1(43.45,22.89)
  BOTTOM w0.254: v1(51.3,29.68) 55.26,25.72 57.57,25.72 58.49,24.8 58.49,24.27 58.1,23.88 58.1,22.36 v1(60.34,20.11)
USART1_RX: length 21.2
  TOP w0.254: v1(56.78,26.32) 56.83,26.1 U1.31 ; 54.86,42.88 55.79,41.96 55.79,35.69 54.6,34.5 v1(54.6,29.16) ; 54.86,42.88 54.83,43 J12.2 54.86,42.88
  BOTTOM w0.254: v1(56.78,26.32) 56.78,26.98 v1(54.6,29.16)
USART1_TX: length 21.9
  TOP w0.254: 57.5,26.19 57.46,26.08 U1.30 57.5,26.19 ; 57.5,26.19 v1(57.5,26.38)
  BOTTOM w0.254: v1(57.5,26.38) 57.83,26.58 58.2,26.95 58.42,26.95 59.1,27.62 59.1,28.3 58.88,28.53 58.69,28.63 58.69,41.83 57.57,42.95 ; 57.57,42.95 57.52,43.05 J12.1 57.57,42.95
USART2_RX: length 11.3
  TOP w0.254: 69.71,18.86 68.86,18 62.39,18 ; 69.71,18.86 J13.2 69.81,18.89 69.71,18.86 ; 62.39,18 62.3,18.04 61.55,18.07 62.39,18
USART2_TX: length 10.9
  TOP w0.254: 60.34,17.21 65.16,17.21 v1(65.36,17.41) ; 60.34,17.21 60.23,17.2 U1.12 60.34,17.21
  BOTTOM w0.254: 67.14,18.93 J13.1 67.25,18.95 67.14,18.93 ; 67.14,18.93 66.88,18.93 v1(65.36,17.41)
N13546: length 7.3
  TOP w0.2: J8.1 41.98,43.8 43.68,42.1 43.68,38.9 43.62,38.85 43.27,38.85 42.98,38.55 42.95,38.42 U5.2
N13563: length 6.3
  TOP w0.2: 40.34,38.42 40.33,38.45 40.02,38.45 ; U5.6 39.77,38.45 40.02,38.45 ; 40.02,38.45 40.02,43.2 39.43,43.8 J8.2
N13598: length 7.4
  TOP w0.2: 38.73,38.45 38.73,40.7 35.62,43.8 J9.1 ; 38.73,38.45 38.48,38.45 U5.8 ; 38.73,38.45 39.02,38.45 39.05,38.42
N13619: length 7.6
  TOP w0.2: J9.2 33.02,43.8 33.02,40.55 35.12,38.45 35.77,38.45 U5.12 36.45,38.42
N15223: length 7.6
  TOP w0.2: J10.1 33.02,0.7 33.02,3.95 35.12,6.05 35.77,6.05 U6.1 36.45,6.03
N15263: length 7.4
  TOP w0.2: 38.73,6.05 38.73,3.8 J10.2 ; 38.73,6.05 39.02,6.05 39.05,6.03 ; 38.73,6.05 38.48,6.05 U6.5
N15407: length 6.3
  TOP w0.2: J11.1 39.43,0.7 40.02,1.3 40.02,6.05 ; U6.7 39.77,6.05 40.02,6.05 ; 40.02,6.05 40.33,6.05 U6.8
N15519: length 7.3
  TOP w0.2: U6.11 42.95,6.03 42.98,5.95 43.27,5.65 43.62,5.65 43.68,5.6 43.68,2.4 J11.2
N31972: length 4.5
  TOP w0.5: U3.8 24.83,2.95 25.53,2.95 26.88,4.3 26.88,5 26.93,5.05 27.93,5.05 C12.2
N31979: length 18.4
  TOP w0.1: 15.89,23.27 L1.1 ; L1.1 17.78,24.36 ; L1.1 17.78,22.17 ; L1.1 19.67,23.27 ; C12.1 27.94,6.99 ; C12.1 27.94,5.84 ; C12.1 28.57,6.42 ; C12.1 27.31,6.42 ; D3.1 22.74,18.97 ; D3.1 21.21,17.15 ; D3.1 24.26,17.15 ; D3.1 22.74,15.32 ; 24.77,7.29 24.77,8.48 ; 24.77,8.48 24.3,8.48 ; 24.77,8.48 25.23,8.48 ; 24.77,8.48 24.77,9.68
N32592: length 10.3
  TOP w0.5: v1(21.58,4.25) 22.23,3.6 U3.6 ; 22.34,0 22.34,0 22.43,0 23.33,0 23.38,-0.05 23.38,-0.6 22.98,-1 21.78,-1 v1(21.73,-0.95)
  BOTTOM w0.5: v1(21.73,-0.95) 21.73,3 21.68,3.05 21.68,3.55 21.58,3.65 v1(21.58,4.25)
N32821: length 15.8
  TOP w0.254: 17.78,6.47 17.88,6.5 18.78,6.5 18.83,6.55 18.83,8.7 18.73,8.8 17.88,8.8 R6.2 17.78,8.8 16.83,8.8 16.78,8.85 16.78,10.9 17.12,11.25 18.78,11.25 19.43,10.6 22.03,10.6 23.53,9.1 23.5,8.48
N35796: length 6.2
  TOP w0.5: v1(22.73,10.85) 24.68,10.85 24.88,11.05 24.88,12.05 C17.1 ; 22.23,8.48 22.23,9.45 v1(21.78,9.9)
  BOTTOM w0.5: v1(21.78,9.9) v1(22.73,10.85)
N36210: length 2.4
  TOP w0.5: R9.2 C17.2
N38494: length 16.4
  TOP w0.254: R8.2 27.12,18.35 26.23,18.35 26.12,18.25 26.12,15.5 26.18,15.45 27.12,15.45 R10.1 27.18,15.35 26.78,14.95 25.43,14.95 v1(24.33,13.85) ; v1(20.12,8.5) 20.93,8.5 20.96,8.48
  BOTTOM w0.254: v1(24.33,13.85) 20.12,9.65 v1(20.12,8.5)
N053341: length 6.6
  TOP w0.254: R1.2 55.76,0.64 54.58,0.65 53.42,1.8 51.33,1.8 50.16,0.64 J2.4
N053344: length 6.6
  TOP w0.254: J2.3 50.16,3.18 50.23,3.25 51.33,4.35 53.42,4.35 54.58,3.2 55.76,3.18 R2.1
N066431: length 3.2
  TOP w0.254: 66.56,11.43 66.56,11.44 R3.1
N066591: length 5.4
  TOP w0.254: R4.1 44.93,23.5 44.43,23.5 44.02,23.9 v1(44.02,25.4) ; v1(44.02,27.05) 44.02,26.9 44.23,26.7 44.93,26.7 44.97,26.68 D2.1
  BOTTOM w0.254: v1(44.02,27.05) v1(44.02,25.4)

## Copper pours and planes (outline as drawn; the poured copper is in the pictures)
GND on TOP: 41.55,40.16 41.55,39.91 42.05,39.91 42.05,36.66 41.55,36.66 41.55,30.91 30.8,30.91 30.8,40.16
GND on TOP: 31.3,8.16 31.3,13.66 41.55,13.66 41.55,8.16 42.05,8.16 42.05,4.66 41.55,4.66 41.55,4.41 35.05,4.41 35.05,4.16 30.8,4.16 30.8,8.16
GND on GND: outline of 100 points within -4.4,-2.77 80.6,47.23
VCC3V3 on POWER: outline of 100 points within -4.4,-2.77 80.6,47.23
VCC5V on POWER: 80.4,12.23 67.6,12.23 67.6,19.23 80.4,19.23
VCC5V on POWER: 62.6,34.23 77.6,34.23 77.6,28.23 62.6,28.23
VCC5V on POWER: 14.6,42.23 46.6,42.23 46.6,7.23 14.6,7.23
N31979 on TOP: outline of 87 points within 14.92,14.35 25.24,25.33
N31979 on TOP: outline of 290 points within 14.92,4.97 31.1,26.22
